# Altium PCB Copy of TQ210_BOARD_V4-20121031.PcbDoc (part 3 of 8)
Units mm, origin at the board's own origin, x right, y up, seen from the top; angles counter-clockwise.
Board outline 191.2 x 131.27 mm, 2 copper layers (TopLayer, BottomLayer); 362 components, 455 nets, 1594 pads, 630 vias.
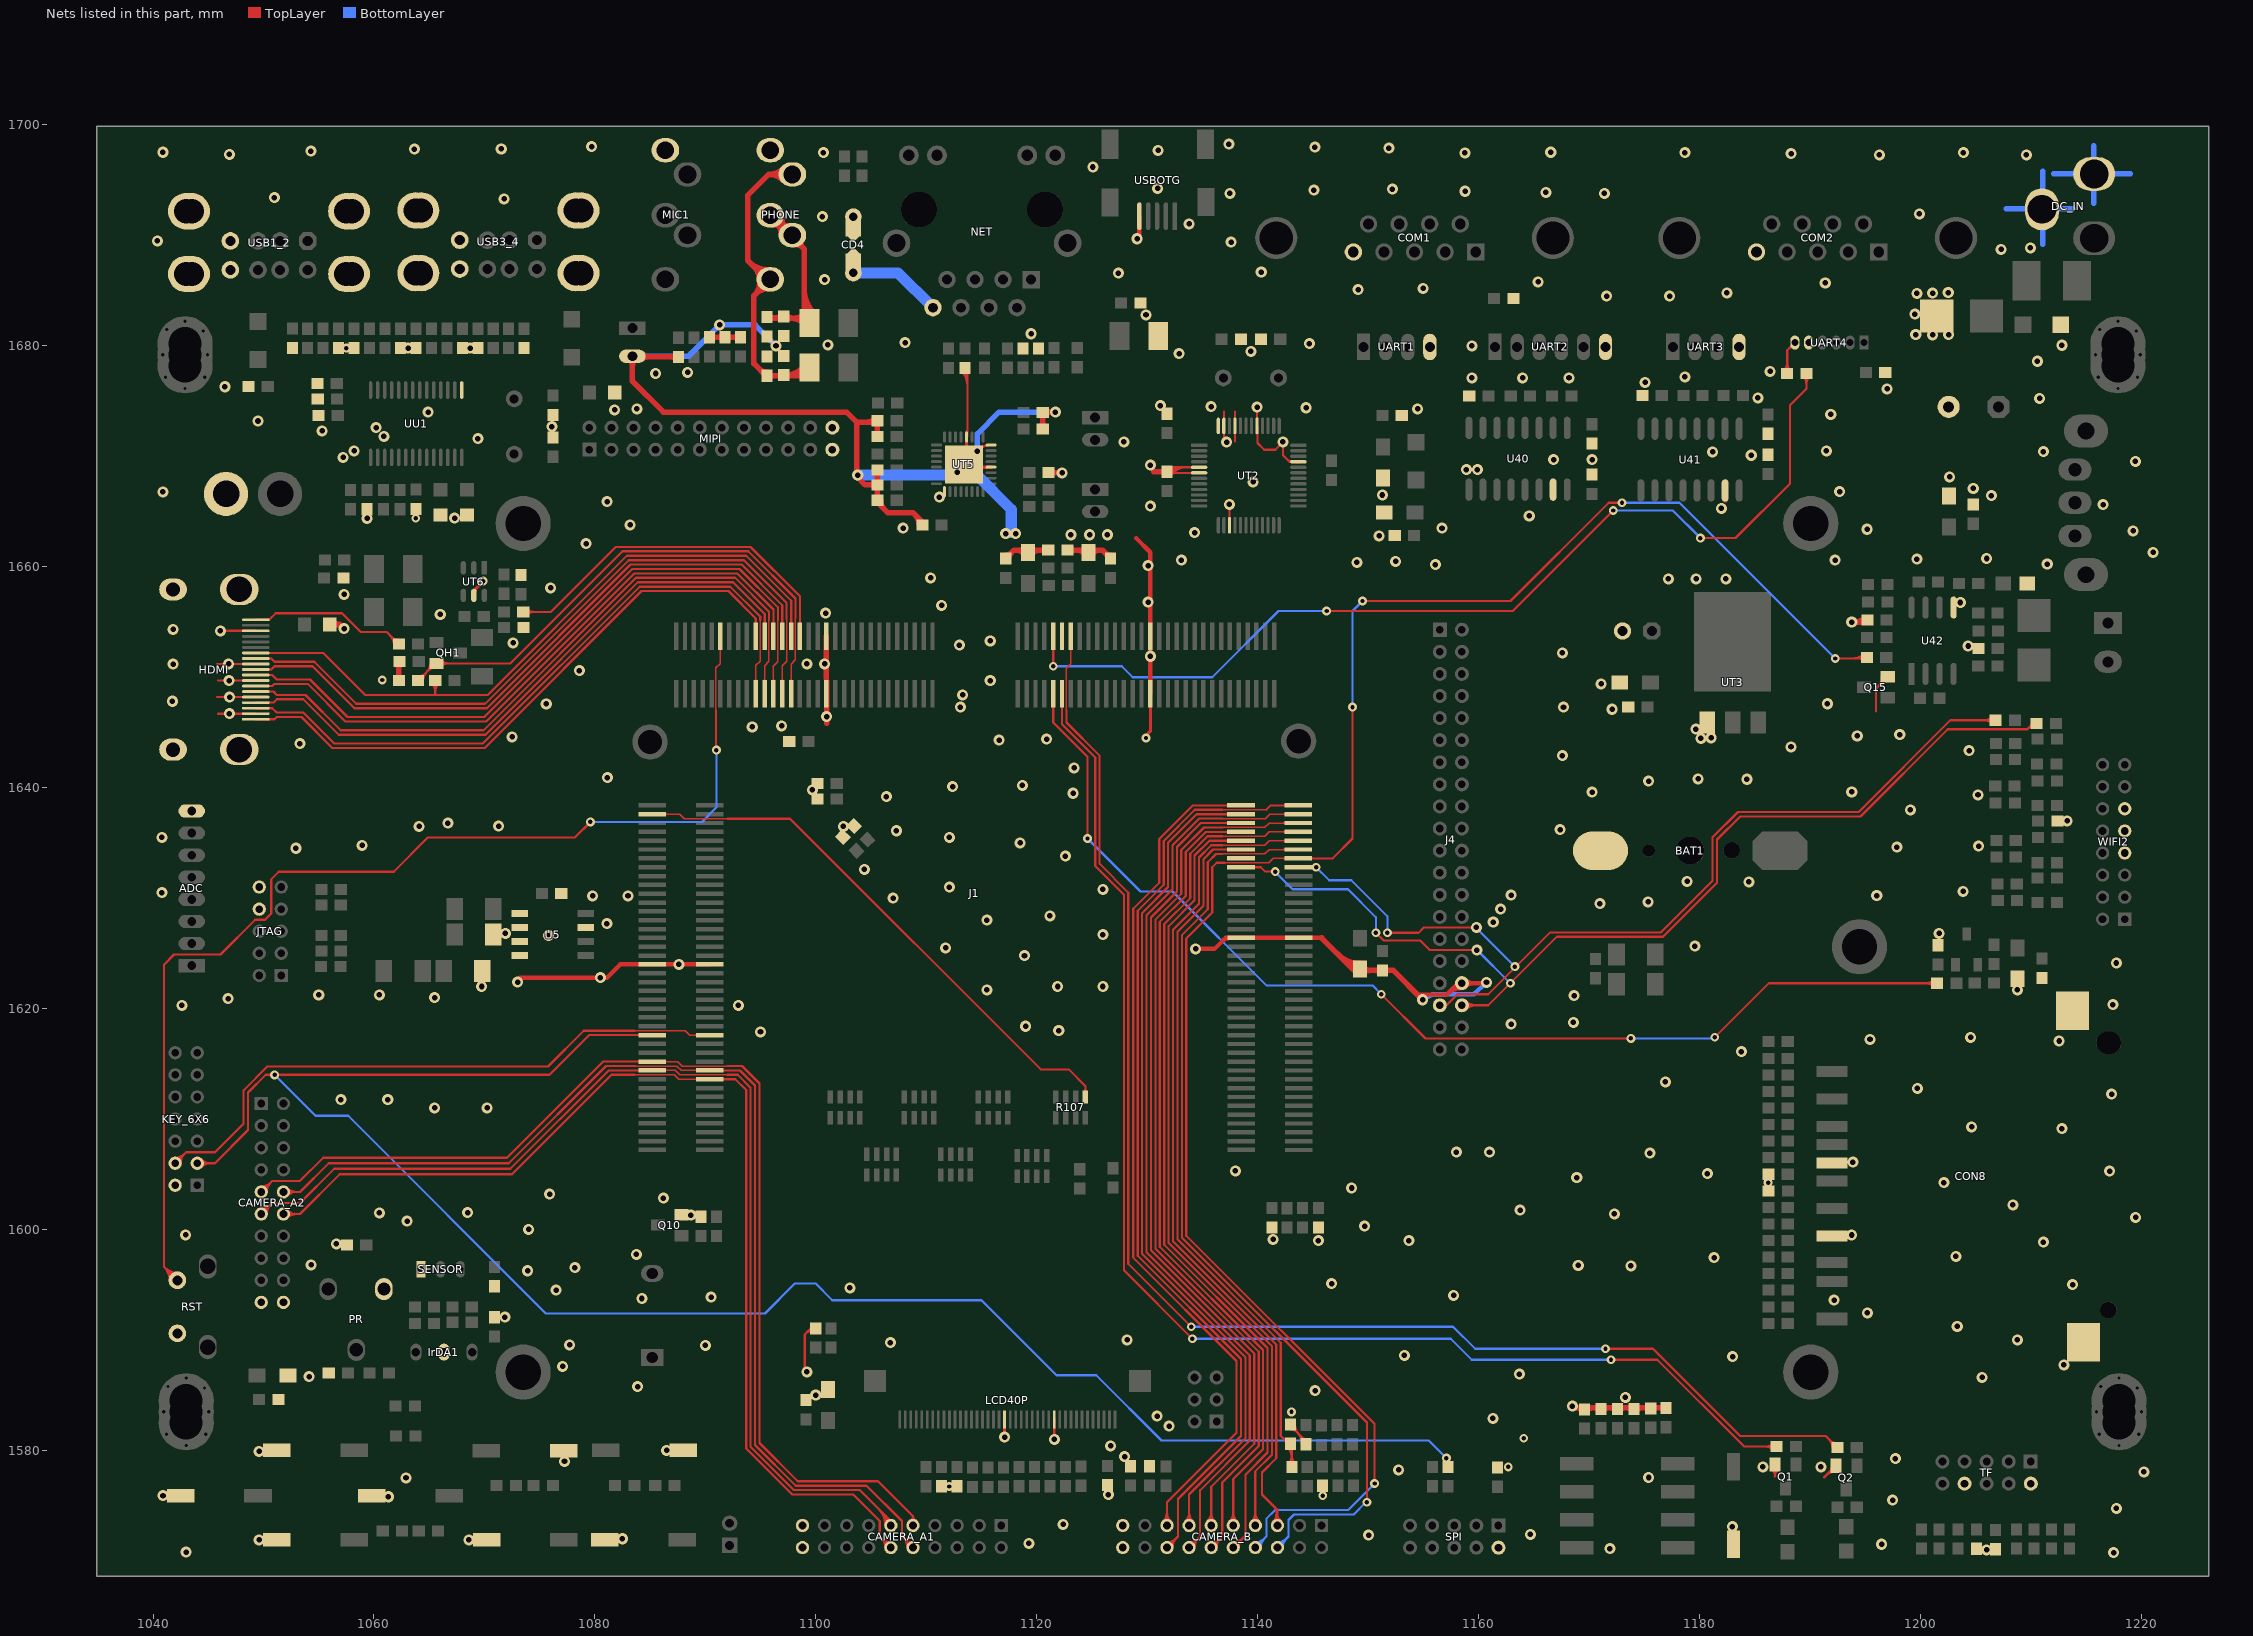
[diagram p3: the nets of this part, all layers, seen from the top]

## Via types
v1: diameter 1, hole 0.5, TopLayer to BottomLayer, 458 vias
v2: diameter 0.8, hole 0.4, TopLayer to BottomLayer, 172 vias

## Nets (pads, with @x,y where several pads share a name; then routed paths per layer and width w, separated by ;. In a path a pad name is that pad's centre, name@x,y a point inside that pad or via, vN(x,y) a via of type N, cw(c..) or ccw(c..) an arc to the next point about the centre after c; other vN are vias at no path point) (continued)
CAMDATA4: CAMERA_A1.12 CAMERA_A2.12 J1.18 | length 103.8
  TopLayer w0.135: 1083.6,1614 1087.2,1614 1087.6,1613.6 J1.18@1090.4,1613.6
  TopLayer w0.2: CAMERA_A2.12@1051.8,1601.4 1053.3,1601.4 1056.9,1605 1072.5,1605 1081.5,1614 1083.6,1614 ; CAMERA_A2.12@1052.012,1601.188 cw(c1052.524,1600.676) 1052.524,1601.4 cw(c1052.524,1602.124) CAMERA_A2.12@1052.012,1601.612 ; CAMERA_A2.12@1052.154,1601.046 cw(c1053.007,1600.193) 1053.007,1601.4 cw(c1053.007,1602.607) CAMERA_A2.12@1052.154,1601.754 ; J1.18@1090.4,1613.6 1092.719,1613.6 1093.7,1612.619 1093.7,1580.163 1097.863,1576 1103.4,1576 1105.8,1573.6 1105.8,1572.2 CAMERA_A1.12@1106.8,1571.2 ; CAMERA_A1.12@1106.3,1571.2 ccw(c1105.093,1571.2) 1105.946,1572.054 ccw(c1106.8,1572.907) CAMERA_A1.12@1106.8,1571.7 ; CAMERA_A1.12@1106.5,1571.2 ccw(c1105.776,1571.2) 1106.288,1571.712 ccw(c1106.8,1572.224) CAMERA_A1.12@1106.8,1571.5
CAMDATA5: CAMERA_A1.11 CAMERA_A2.11 J1.19 | length 105.7
  TopLayer w0.135: J1.19@1085.2,1614.4 1087.3,1614.4 1087.7,1614 1092,1614
  TopLayer w0.2: CAMERA_A2.11@1049.8,1601.4 1050.8,1602.4 1053.3,1602.4 1056.4,1605.5 1072.35,1605.5 1081.25,1614.4 J1.19@1085.2,1614.4 ; CAMERA_A2.11@1049.8,1601.7 ccw(c1049.8,1602.424) 1050.312,1601.912 ccw(c1050.824,1601.4) CAMERA_A2.11@1050.1,1601.4 ; CAMERA_A2.11@1049.8,1601.9 ccw(c1049.8,1603.107) 1050.654,1602.254 ccw(c1051.507,1601.4) CAMERA_A2.11@1050.3,1601.4 ; 1092,1614 1092.929,1614 1094.1,1612.829 1094.1,1580.328 1098.028,1576.4 1104,1576.4 1106.8,1573.6 CAMERA_A1.11@1106.8,1573.2 ; 1105.664,1574.736 cw(c1104.127,1573.2) CAMERA_A1.11@1106.3,1573.2 ; 1106.005,1574.395 cw(c1104.81,1573.2) CAMERA_A1.11@1106.5,1573.2 ; 1106.346,1574.054 cw(c1105.493,1573.2) CAMERA_A1.11@1106.7,1573.2
CAMDATA6: CAMERA_A1.10 CAMERA_A2.10 J1.20 | length 105.7
  TopLayer w0.135: 1083.6,1614.8 1087.4,1614.8 1087.8,1614.4 J1.20@1090.4,1614.4
  TopLayer w0.2: CAMERA_A2.10@1051.8,1603.4 1053.3,1603.4 1055.9,1606 1072.2,1606 1081,1614.8 1083.6,1614.8 ; CAMERA_A2.10@1052.012,1603.188 cw(c1052.524,1602.676) 1052.524,1603.4 cw(c1052.524,1604.124) CAMERA_A2.10@1052.012,1603.612 ; CAMERA_A2.10@1052.154,1603.046 cw(c1053.007,1602.193) 1053.007,1603.4 cw(c1053.007,1604.607) CAMERA_A2.10@1052.154,1603.754 ; J1.20@1090.4,1614.4 1093.138,1614.4 1094.5,1613.038 1094.5,1580.494 1098.194,1576.8 1104.6,1576.8 1107.8,1573.6 1107.8,1572.2 CAMERA_A1.10@1108.8,1571.2 ; CAMERA_A1.10@1108.3,1571.2 ccw(c1107.093,1571.2) 1107.946,1572.054 ccw(c1108.8,1572.907) CAMERA_A1.10@1108.8,1571.7 ; CAMERA_A1.10@1108.5,1571.2 ccw(c1107.776,1571.2) 1108.288,1571.712 ccw(c1108.8,1572.224) CAMERA_A1.10@1108.8,1571.5
CAMDATA7: CAMERA_A1.9 CAMERA_A2.9 J1.21 | length 104.8
  TopLayer w0.135: J1.21@1085.2,1615.2 1087.5,1615.2 1087.9,1614.8 1092,1614.8
  TopLayer w0.2: CAMERA_A2.9@1049.8,1603.4 1050.8,1604.4 1053.3,1604.4 1055.4,1606.5 1072.05,1606.5 1080.75,1615.2 J1.21@1085.2,1615.2 ; CAMERA_A2.9@1049.8,1603.7 ccw(c1049.8,1604.424) 1050.312,1603.912 ccw(c1050.824,1603.4) CAMERA_A2.9@1050.1,1603.4 ; CAMERA_A2.9@1049.8,1603.9 ccw(c1049.8,1605.107) 1050.654,1604.254 ccw(c1051.507,1603.4) CAMERA_A2.9@1050.3,1603.4 ; 1092,1614.8 1093.323,1614.8 1094.9,1613.223 1094.9,1580.66 1098.36,1577.2 1105.634,1577.2 1108.8,1574.034 ; CAMERA_A1.9@1108.564,1573.641 ccw(c1108.354,1574.034) 1108.8,1574.034 ; CAMERA_A1.9@1108.8,1573.2 1108.8,1574.034 ; CAMERA_A1.9@1109.036,1573.641 cw(c1109.246,1574.034) 1108.8,1574.034
DAC_OUT0: J1.109 RT64.1 | length 34.5
  TopLayer w0.2: RT64.1@1073.51,1655.911 1076,1655.911 1081.889,1661.8 1094.1,1661.8 1098.575,1657.325 J1.109@1098.575,1653.687 ; RT64.1@1073.843,1655.629 cw(c1074.526,1654.946) 1074.526,1655.911 cw(c1074.526,1656.877) RT64.1@1073.843,1656.194
EXT_NRESET: J1.91 RST.2 | length 107
  TopLayer w0.135: 1090.965,1647.016 1090.965,1650.837 1091.365,1651.236 J1.91@1091.365,1653.697
  TopLayer w0.2: RST.2@1041.5,1595.4 ccw(c1039.81,1595.4) 1041.005,1596.595 ccw(c1042.2,1597.79) RST.2@1042.2,1596.1 ; RST.2@1041.7,1595.4 ccw(c1040.493,1595.4) 1041.346,1596.254 ccw(c1042.2,1597.107) RST.2@1042.2,1595.9 ; RST.2@1042.2,1595.4 1041,1596.6 1041,1624 1041.9,1624.9 1046.1,1624.9 1049.238,1628.038 1050.138,1628.038 1050.7,1628.6 1050.7,1631.7 1051.385,1632.385 1061.785,1632.385 1064.9,1635.5 1078.2,1635.5 v2(1079.6,1636.9) ; v2@1090.981,1643.419 1090.981,1647
  BottomLayer w0.2: v2(1079.6,1636.9) 1089.703,1636.9 1091,1638.197 v2(1091,1643.4)
GND: ADC.8 BAT1.2 C1.2 C3.2 C5.2 C6.2 C8.2 C9.2 C10.2 C11.2 C12.2 C15.2 C17.2 C21.2 C22.2 C23.2 C101.2 C102.2 C105.2 C106.2 C107.2 C111.2 C201.2 C202.2 C203.2 C205.2 C207.1 C208.1 C210.2 C211.1 C212.1 C403.2 C404.2 C405.2 C413.2 C414.2 C415.2 C423.1 C501.2 C513.2 C517.2 C518.2 CAMERA_A1.19 CAMERA_A1.20 CAMERA_A2.19 CAMERA_A2.20 CAMERA_B.19 CAMERA_B.20 CD1.2 CD2.2 CD4.2 CL1.2 CL2.2 CL3.2 CL4.2 CL5.2 CM1.2 CM2.2 CM3.2 CM4.2 CMB1.2 CMB2.2 COM1.5 COM2.5 CON8.3 CON8.6 CON8.13 CON8.14 CS1.2 CS2.2 CT6.1 CU1.2 CU2.2 CU3.1 CU4.2 CU5.2 CU6.2 CU7.2 CU10.1 CU11.1 CV1.2 CW1.2 CW2.1 CW4.1 CW5.2 D6.1 D8.1 D101.1 DC_IN.2 DC_IN.3 HDMI.2 HDMI.5 HDMI.8 HDMI.11 HDMI.17 HDMI.20 HDMI.21 HDMI.22 HDMI.23 IrDA1.2 J1.43 J1.44 J1.115 J1.116 J1.171 J1.172 J1.231 J1.232 J4.34 JTAG.8 JTAG.10 KEY1.2 KEY2.2 KEY3.2 KEY4.2 KEY5.2 KEY6.2 KEY7.2 KEY8.2 KEY_6X6.2 KEYON.2 L502.1 LCD40P.20 LCD40P.29 MIPI.23 MIPI.24 POWER.2 PR.1 Q1.E Q2.E Q10.E Q15.E R31.2 R204.2 R424.2 RF2.2 RH13.1 RH14.2 RM6.2 RM21.1 RMB6.2 RMB21.1 RO1.1 RO2.2 RO3.2 RO4.2 RO5.1 RO6.1 RST.1 RT1.2 RT3.1 RT63.2 RT65.2 RU3.1 RU4.1 RU7.1 RU8.1 RU11.1 RU12.1 RU15.1 RU16.1 RU17.2 RU21.2 SENSOR.1 SPI.2 TF.2 TF.8 TVOUT.2 U5.1 U5.2 U5.3 U5.4 U5.7 U40.15 U41.15 U42.5 UART1.4 UART2.6 UART3.4 UART4.5 USB1_2.4 USB1_2.8 USB1_2.9 USB1_2.10 USB1_2.11 USB1_2.12 USB3_4.4 USB3_4.8 USB3_4.9 USB3_4.10 USB3_4.11 USB3_4.12 USBOTG.5 UT2.5 UT2.6 UT2.15 UT2.33 UT2.41 UT2.45 UT2.47 UT2.48 UT3.1 UT5.9 UT6.5 UU1.1 WIFI2.7 WIFI2.9 WIFI2.11 | length 238.1
  TopLayer w0.2: 1045.8,1648.2 HDMI.5@1049.3,1648.2 ; 1045.8,1651.2 HDMI.11@1049.3,1651.2 ; v1@1045.8,1654.2 HDMI.17@1049.3,1654.2 ; 1045.9,1646.7 HDMI.2@1049.3,1646.7 ; 1045.9,1649.7 HDMI.8@1049.3,1649.7 ; RH13.1@1062.252,1651.359 RH13.1@1062.298,1651.405 ; UT6.5@1069.045,1657.845 UT6.5@1069.045,1657.412 UT6.5@1069.1,1657.467 ; 1099.015,1590.515 cw(c1099.759,1589.772) R31.2@1099.961,1590.804 ; v1(1099.2,1587.1) 1099,1587.3 1099,1590.5 1099.55,1591.05 R31.2@1100,1591.05 ; 1099.281,1590.781 cw(c1099.846,1590.216) R31.2@1100,1591 ; 1100.975,1645.825 1101,1645.8 ; C211.1@1131.659,1668.791 cw(c1132.172,1668.278) C211.1@1132.172,1669.004 ; C211.1@1131.8,1668.65 cw(c1132.655,1667.795) 1132.655,1669.004 ; C211.1@1131.941,1668.509 cw(c1133.138,1667.312) 1133.138,1669.004 ; C211.1@1131.941,1668.691 ccw(c1132.393,1669.143) 1132.393,1668.504 ; C211.1@1132,1669 1132.004,1669.004 UT2.5@1134.703,1669.004 ; C211.1@1132.004,1668.504 UT2.6@1134.703,1668.504 ; C211.1@1132.083,1668.267 cw(c1132.655,1667.695) 1132.655,1668.504 ; C211.1@1132.083,1668.367 cw(c1133.621,1666.829) 1133.621,1669.004 ; C211.1@1132.083,1668.833 ccw(c1132.876,1669.626) 1132.876,1668.504 ; v1@1136.953,1671.6 1136.953,1674.055 ; UT2.15@1137.453,1663.754 v1(1137.453,1665.653) ; 1137.953,1671.343 1137.953,1674.045 ; UT2.41@1139.918,1672.119 cw(c1139.712,1671.913) 1140.003,1671.913 ; UT2.41@1139.953,1672.754 v1(1139.953,1674.453) v1@1140.1,1674.6 ; UT2.41@1140.003,1672.704 1140.003,1671.2 1140.603,1670.6 1141.6,1670.6 v1(1142.3,1671.3) 1142.3,1670.1 1142.896,1669.504 UT2.33@1143.6,1669.504 ; 1142.664,1669.736 ccw(c1143.103,1670.176) UT2.33@1143.103,1669.554 ; RMB6.2@1143,1581.9 cw(c1143,1581.135) 1143.541,1581.676 ; RMB6.2@1143,1582.35 1143,1582.217 C8.2@1144.448,1580.769 ; RMB6.2@1143.2,1582.3 ccw(c1143.884,1582.3) RMB6.2@1143.4,1581.817 ; RMB6.2@1143.4,1582.3 ccw(c1144.567,1582.3) 1143.742,1581.475 ; 1143.562,1581.655 cw(c1142.518,1580.611) C8.2@1143.995,1580.611 ; 1143.904,1581.313 cw(c1143.201,1580.611) C8.2@1144.195,1580.611 ; 1144.073,1581.144 ccw(c1144.395,1581.465) C8.2@1144.395,1581.011 ; J4.34@1158.1,1622.3 J4.34@1158.5,1622.3 ; v1(1160.729,1622.374) v1@1160.729,1622.629 ; Q1.E@1186.577,1578.272 cw(c1186.008,1577.649) 1186.852,1577.649 ; 1186.832,1577.629 1186.852,1577.649 ; Q1.E@1186.852,1578.7 1186.852,1577.649 ; Q1.E@1187.127,1578.272 ccw(c1187.695,1577.649) 1186.852,1577.649 ; 1191.289,1577.538 Q2.E@1192.36,1578.609 ; 1191.447,1577.696 cw(c1192.36,1576.782) Q2.E@1192.36,1578.074 ; 1191.754,1578.002 ccw(c1191.274,1578.482) Q2.E@1191.952,1578.482 ; 1191.788,1578.037 cw(c1192.36,1577.465) Q2.E@1192.36,1578.274 ; 1196,1646.9 1196,1648.981 Q15.E@1197.059,1650.04 ; 1196.146,1649.126 ccw(c1195.232,1650.04) Q15.E@1196.524,1650.04 ; 1196.452,1649.433 cw(c1196.932,1648.953) Q15.E@1196.932,1649.632 ; 1196.487,1649.468 ccw(c1195.915,1650.04) Q15.E@1196.724,1650.04
  TopLayer w0.25: v1@1117.1,1580.85 LCD40P.20@1117.1,1583.3 ; v1@1121.6,1581.1 LCD40P.29@1121.6,1582.8
  TopLayer w0.3: UT6.5@1069.045,1657.845 v2(1069.9,1658.7) ; UT6.5@1069.145,1657.762 cw(c1069.585,1657.762) 1069.274,1658.074 ; v2@1129.9,1644.7 1130.306,1645.106 J1.172@1130.306,1648.495 ; UT2.33@1143.6,1669.504 UT2.33@1143.703,1669.504
  TopLayer w0.4: v1@1073.2,1622.8 1081.1,1622.8 1082.3,1624 J1.44@1090.4,1624 ; 1129,1662.6 1130.296,1661.304 1130.296,1655.322 J1.172@1130.296,1648.506 ; v1@1129.3,1689.9 USBOTG.5@1129.3,1691.75 ; v1(1134.4,1625.4) 1136.1,1625.4 1137.095,1626.395 J1.231@1143.715,1626.395 1145.805,1626.395 ; 1136.833,1626.133 cw(c1137.465,1625.501) 1137.465,1626.395 ccw(c1137.372,1625.747) 1136.91,1626.21 ; 1154.527,1621.275 1157.127,1621.275 ; v1(1154.95,1620.8) 1155.425,1621.275 ; 1157.106,1621.244 1158.163,1622.3 v1@1160.7,1622.3 ; 1157.181,1621.319 cw(c1158.5,1620) J4.34@1158.5,1621.865 ; 1157.864,1622.002 cw(c1158.5,1621.366) J4.34@1158.5,1622.265 ; J4.34@1158.808,1621.992 cw(c1159.55,1621.25) 1159.55,1622.3 cw(c1159.55,1623.35) J4.34@1158.808,1622.608
  TopLayer w0.5: CU7.2@1056.004,1654.779 1056.921,1654.779 v1(1057.3,1654.4) ; CU7.2@1056.252,1654.531 cw(c1056.849,1653.934) 1056.849,1654.779 cw(c1056.849,1655.624) CU7.2@1056.252,1655.026 ; RH13.1@1062.071,1651.229 cw(c1061.636,1650.793) 1062.252,1650.793 ; RH14.2@1062.075,1649.871 ccw(c1061.648,1650.298) 1062.252,1650.298 ccw(c1062.855,1650.298) RH14.2@1062.429,1649.871 ; RH14.2@1062.252,1649.695 RH13.1@1062.252,1651.359 ; 1062.252,1650.811 cw(c1062.843,1650.811) RH13.1@1062.425,1651.229 ; J1.115@1100.965,1653.697 1100.975,1645.825 ; C513.2@1121.078,1668.524 v1@1122.276,1668.524 ; C513.2@1121.305,1668.347 cw(c1121.731,1667.92) 1121.731,1668.524 cw(c1121.731,1669.128) C513.2@1121.305,1668.701 ; L502.1@1122.8,1661.5 1125.95,1661.5 C518.2@1126.7,1660.75 ; L502.1@1123.027,1661.323 cw(c1123.454,1660.896) 1123.454,1661.5 cw(c1123.454,1662.104) L502.1@1123.027,1661.677 ; 1123.58,1661.5 cw(c1123.58,1660.301) C517.2@1124.428,1661.149 ; 1123.961,1661.5 ccw(c1123.961,1662.16) C517.2@1124.428,1661.693 ; C517.2@1124.972,1661.149 cw(c1125.82,1660.301) 1125.82,1661.5 ; C517.2@1124.972,1661.693 ccw(c1125.439,1662.16) 1125.439,1661.5 ; 1126.188,1661.262 ccw(c1126.7,1661.774) C518.2@1126.7,1661.05 ; C518.2@1126.309,1661.141 cw(c1125.967,1660.8) C518.2@1126.45,1660.8 ; 1130.6,1668.597 1130.603,1668.6 C211.1@1131.8,1668.6 ; 1145.805,1626.395 1148.75,1623.45 1152.3,1623.45 v1(1154.95,1620.8) ; 1147.295,1624.905 ccw(c1149.263,1626.874) C21.2@1149.263,1624.09 ; 1148.148,1624.052 ccw(c1149.263,1625.166) C21.2@1149.263,1623.59 ; C21.2@1149.535,1623.179 cw(c1150.19,1622.524) 1150.19,1623.45 ; C21.2@1149.535,1623.723 ccw(c1150.195,1624.383) 1150.195,1623.45 ; CMB2.2@1151.123,1623.273 ccw(c1150.696,1622.846) 1150.696,1623.45 ccw(c1150.696,1624.054) CMB2.2@1151.123,1623.627 ; CMB2.2@1151.477,1623.273 cw(c1151.904,1622.846) 1151.904,1623.45 cw(c1151.904,1624.054) CMB2.2@1151.477,1623.627 ; v1@1168.324,1583.868 1168.342,1583.85 RT1.2@1177,1583.85 ; v1@1168.816,1583.85 cw(c1168.816,1582.96) RO1.1@1169.445,1583.589 ; RO1.1@1169.799,1583.589 cw(c1170.428,1582.96) 1170.428,1583.85 ; 1170.376,1583.85 cw(c1170.376,1583.076) RO2.2@1170.923,1583.623 ; BAT1.2@1171,1632.9 BAT1.2@1171,1634.5 ; RO2.2@1171.277,1583.623 cw(c1171.824,1583.076) 1171.824,1583.85 ; 1171.876,1583.85 cw(c1171.876,1583.076) RO3.2@1172.423,1583.623 ; RO3.2@1172.777,1583.623 cw(c1173.324,1583.076) 1173.324,1583.85 ; 1173.376,1583.85 cw(c1173.376,1583.076) RO4.2@1173.923,1583.623 ; RO4.2@1174.277,1583.623 cw(c1174.824,1583.076) 1174.824,1583.85 ; C1.2@1175.423,1583.673 ccw(c1174.996,1583.246) 1174.996,1583.85 ccw(c1174.996,1584.454) C1.2@1175.423,1584.027 ; C1.2@1175.777,1583.673 cw(c1176.204,1583.246) 1176.204,1583.85 cw(c1176.204,1584.454) C1.2@1175.777,1584.027 ; RT1.2@1176.823,1583.673 ccw(c1176.396,1583.246) 1176.396,1583.85 ccw(c1176.396,1584.454) RT1.2@1176.823,1584.027 ; U41.15@1182.33,1666.07 U41.15@1182.33,1667.112 ; v1(1193.8,1655) 1195.022,1655 C423.1@1195.21,1655.187 ; v1@1194.104,1655 ccw(c1194.104,1656.243) C423.1@1194.983,1655.364
  BottomLayer w0.2: v1@1160.729,1622.357 v1(1160.729,1622.374)
  BottomLayer w0.4: v1(1154.95,1620.8) 1155.878,1621.282 1159.578,1621.282 v1@1160.729,1622.357
  BottomLayer w0.5: 1207.798,1692.4 1213.8,1692.4 ; 1211.098,1689.2 1211.098,1695.8 ; 1212.1,1695.597 1219,1695.597 ; 1215.7,1692.897 1215.7,1698.098
  other v1: 1217.5,1570.75 1043,1570.787 1206,1571 1171.9,1571.1 1196.5,1571.5 1119.302,1571.574 1049.6,1571.9 1068.6,1571.9 1082.5,1572 1150.061,1572.336 1164.7,1572.4 1183,1573.1 1122.4,1573.3 1217.75,1574.75 1197.5,1575.5 1061.3,1575.8 1040.9,1575.9 1126.5,1576 1062.9,1577.5 1175.398,1577.543 1220.241,1578.051 1152.779,1578.229 1185.75,1578.5 1191,1578.5 1077.25,1579 1197.75,1579.25 1127.97,1579.435 1049.6,1579.9 1086.5,1580 1126.7,1580.4 1121.613,1580.997 1117.1,1581.2 1132,1582.2 1161.298,1582.9 1130.9,1583.1 1168.5,1584 1173.3,1584.8 1100,1585 1145.21,1585.417 1083.869,1585.773 1205.6,1586.6 1054.125,1586.687 1163.7,1586.9 1077.087,1587.597 1213,1587.75 1183.005,1588.491 1153.3,1588.6 1090,1589.5 1077.722,1589.557 1106.75,1589.75 1128.2,1590 1208.8,1589.997 1203.35,1591.234 1071.855,1592.072 1195.222,1592.453 1192.2,1593.6 1084.25,1593.75 1090.524,1593.875 1157.757,1594.028 1076.5,1594.5 1103.098,1594.714 1213.798,1595 1146.7,1595.1 1073.912,1596.263 1078.198,1596.542 1173.8,1596.7 1169.035,1596.746 1054.303,1596.796 1181.329,1597.457 1203.223,1597.558 1083.767,1597.736 1056.6,1598.7 1211.148,1598.854 1145.5,1599 1153.7,1598.997 1141.4,1599.1 1193.795,1599.5 1042.949,1599.514 1074,1600 1149.7,1600.3 1063,1600.75 1219.5,1601.097 1088.7,1601.3 1172.312,1601.419 1060.5,1601.5 1068.476,1601.521 1163.777,1601.749 1208.38,1602.232 1086.206,1602.842 1075.9,1603.2 1148.512,1603.756 1202.131,1604.239 1168.9,1604.7 1180.719,1605.051 1217.143,1605.28 1138,1605.3 1193.9,1606.1 1175.512,1606.906 1158,1607 1161,1607 1212.825,1609.141 1204.646,1609.293 1065.5,1611 1070.25,1611 1057,1611.75 1061.25,1611.75 1217.32,1612.265 1199.744,1612.773 1176.934,1613.357 1183.8,1616.1 1212.571,1617.066 1195.451,1617.218 1204.57,1617.396 1094.998,1617.9 1122,1618 1119,1618.4 1162.964,1618.59 1168.603,1618.742 1042.6,1620.297 1093,1620.297 1217.447,1620.368 1046.8,1620.897 1065.5,1621 1168.654,1621.18 1055,1621.25 1060.5,1621.25 1115.5,1621.7 1208.8,1621.7 1069.75,1622 1121.9,1622 1126,1622 1073,1622.397 1080.5,1622.8 1087.6,1624 1217.752,1624.127 1118.9,1624.8 1111.75,1625.5 1179.601,1625.651 1075.8,1626.6 1126,1626.7 1071.9,1626.8 1201.7,1626.8 1081.098,1627.697 1161.339,1627.835 1115.5,1628 1121.2,1628.397 1162,1628.997 1170.991,1629.512 1175.36,1629.664 1107,1630 1079.8,1630.2 1083,1630.2 1196.061,1630.223 1162.964,1630.274 1040.8,1630.497 1203.884,1630.604 1126,1630.8 1112.1,1631 1184.478,1631.467 1178.89,1631.518 1104.4,1632.6 1122.6,1633.8 1052.932,1634.515 1197.889,1634.617 1205.281,1634.719 1058.926,1634.769 1118.5,1634.997 1040.8,1635.5 1112.098,1635.5 1107.298,1636.1 1167.4,1636.197 1064.098,1636.5 1102.5,1636.5 1071.296,1636.522 1066.7,1636.797 1213.3,1637 1199.1,1638 1106.4,1639.197 1205.23,1639.341 1123.298,1639.497 1170.298,1639.6 1193.8,1639.621 1099.7,1639.8 1112.4,1640.097 1118.698,1640.2 1175.398,1640.6 1184.3,1640.764 1179.898,1640.8 1081.126,1640.916 1123.4,1641.8 1167.598,1642.9 1204.417,1643.355 1188.298,1643.7 1053.3,1643.997 1116.6,1644.3 1120.9,1644.4 1180.135,1644.472 1181.075,1644.523 1072.5,1644.597 1194.298,1644.7 1198.143,1644.802 1179.678,1645.31 1094.25,1645.5 1096.9,1645.6 1100.975,1646.428 1046.912,1646.7 1172.098,1647.1 1113.1,1647.297 1167.7,1647.297 1075.6,1647.597 1191.598,1647.6 1041.756,1647.825 1046.937,1648.2 1113.3,1648.4 1171.1,1649.397 1046.886,1649.7 1115.8,1649.697 1078.6,1650.597 1041.806,1651.178 1046.836,1651.2 1099.2,1651.2 1100.8,1651.2 1130.296,1651.9 1167.598,1652.2 1204.341,1652.829 1112.998,1652.9 1072.591,1653.108 1115.8,1653.3 1046.099,1654.2 1041.806,1654.327 1066,1655.697 1100.9,1655.8 1111.4,1656.5 1203.63,1656.766 1130.098,1656.8 1057.3,1657.497 1076,1658.097 1177.2,1658.9 1179.7,1658.9 1182.395,1658.899 1110.4,1658.997 1130.098,1660.1 1156.1,1660.197 1211.5,1660.25 1148.998,1660.4 1152.5,1660.497 1133.098,1660.6 1192.3,1660.6 1199.7,1660.7 1206,1660.75 1221.08,1661.312 1079.2,1662.1 1151,1662.8 1123.1,1662.9 1124.8,1662.9 1126.4,1662.9 1134.298,1663.1 1219.276,1663.243 1195.198,1663.4 1107.9,1663.5 1156.7,1663.497 1083.2,1663.797 1059.384,1664.376 1067.298,1664.397 1164.598,1664.6 1182,1665.297 1130.3,1665.5 1216.558,1665.63 1081.1,1665.897 1111.2,1666.3 1206.449,1666.443 1151.3,1666.5 1040.892,1666.773 1192.7,1666.797 1204.798,1667.104 1139.6,1667.697 1202.665,1668.145 1122.3,1668.5 1158.898,1668.8 1159.9,1668.8 1130.3,1669.197 1219.479,1669.542 1166.8,1669.7 1170.3,1669.7 1057.2,1669.9 1184.7,1670.1 1181.2,1670.4 1211.148,1670.431 1058.2,1670.5 1191.5,1670.5 1127.9,1671.3 1137.2,1671.297 1069.4,1671.597 1060.9,1671.8 1055.3,1672.3 1060.198,1672.6 1076.1,1672.7 1049.5,1673.2 1191.898,1673.8 1064.9,1673.997 1081.798,1674.2 1083.8,1674.297 1154.5,1674.3 1144.4,1674.4 1135.798,1674.5 1131.2,1674.6 1210.818,1675.257 1185.298,1675.3 1197,1676.1 1046.5,1676.3 1175.1,1676.7 1159.4,1677.1 1163.998,1677.1 1168.198,1677.1 1178.698,1677.2 1085.5,1677.5 1088.4,1677.6 1186.4,1677.7 1210.615,1678.61 1132.9,1679.3 1139.4,1679.5 1063.1,1679.8 1068.7,1679.8 1159.4,1679.997 1212.825,1680.058 1101.1,1680.1 1144.7,1680.2 1108.1,1680.297 1201.115,1680.997 1199.591,1681.023 1202.563,1681.023 1119.5,1681.1 1129.9,1682.8 1199.515,1682.877 1171.6,1684.497 1177.3,1684.497 1199.693,1684.757 1201.115,1684.782 1182.5,1684.797 1202.538,1684.833 1149.1,1685.097 1154.998,1685.2 1191.4,1685.697 1165.4,1685.8 1100.8,1685.997 1127.4,1686.597 1140.333,1686.687 1207.313,1688.744 1209.98,1688.871 1137.6,1689.4 1040.4,1689.5 1129.1,1689.7 1133.805,1691.056 1100.6,1691.697 1199.921,1691.945 1071.778,1693.316 1050.99,1693.42 1137.5,1693.8 1171.4,1693.8 1166.1,1693.9 1158.799,1694.002 1145.1,1694.1 1152.2,1694.2 1130.96,1694.256 1125.1,1696.197 1196.3,1697.3 1209.6,1697.3 1046.901,1697.331 1188.3,1697.4 1158.773,1697.482 1100.698,1697.5 1178.7,1697.5 1203.9,1697.5 1040.892,1697.533 1166.546,1697.533 1054.292,1697.636 1131,1697.7 1063.65,1697.812 1071.524,1697.838 1151.9,1697.9 1145.2,1698 1079.703,1698.041 1137.412,1698.269
  other v2: 1145.9,1575.9 1112.088,1576.73 1162.7,1578.5 1164.1,1581.1 1143.076,1583.487 1186.231,1604.239 1129.9,1644.5 1060.75,1649.75 1063.778,1664.402 1057.5,1679.8
GND_AC97: C503.2 C504.2 C505.2 C506.1 C509.2 C510.2 C511.2 C512.2 C519.2 C520.2 C521.2 C522.2 C523.2 C525.2 C526.2 C527.2 L502.2 MIC1.1 MIC2.2 PHONE.1 R502.1 R503.1 R506.2 UT5.20 UT5.24 UT5.28 UT5.33 | length 143.3
  TopLayer w0.2: C506.1@1113.217,1677.667 cw(c1111.984,1676.434) 1113.728,1676.434 ; C506.1@1113.359,1677.809 cw(c1112.467,1676.917) 1113.728,1676.917 ; C506.1@1113.5,1677.95 cw(c1112.95,1677.4) 1113.728,1677.4 ; UT5.28@1113.635,1672.142 ccw(c1113.411,1672.365) 1113.728,1672.365 ; UT5.28@1113.653,1671.749 1113.728,1671.824 1113.728,1677.672 C506.1@1113.7,1677.7 ; UT5.33@1114.967,1669.02 UT5.33@1114.971,1669.024
  TopLayer w0.25: UT5.33@1113.285,1669.321 cw(c1115.517,1668.583) UT5.33@1114.996,1670.875 ; UT5.33@1113.523,1669.243 cw(c1116.008,1668.42) UT5.24@1115.428,1670.973 ; UT5.33@1114.992,1670.874 UT5.24@1115.551,1671.001
  TopLayer w0.3: UT5.33@1113.646,1670.747 UT5.28@1113.653,1671.749 ; UT5.33@1114.971,1669.024 UT5.20@1115.878,1669.024
  TopLayer w0.5: MIC2.2@1083.153,1678.813 cw(c1082.555,1678.215) 1083.4,1678.215 cw(c1084.245,1678.215) MIC2.2@1083.647,1678.813 ; MIC2.2@1083.4,1679.06 1083.4,1676.8 1086.2,1674 1102.8,1674 1103.7,1673.1 ; MIC2.2@1083.5,1679 1087.56,1679 C525.2@1087.574,1678.986 ; MIC2.2@1084.247,1678.813 cw(c1084.7,1678.36) 1084.7,1679 ; MIC2.2@1084.247,1679.307 ccw(c1084.99,1680.05) 1084.99,1679 ; 1086.936,1679 cw(c1086.936,1678.347) C525.2@1087.397,1678.809 ; 1087.005,1679 ccw(c1087.005,1679.554) C525.2@1087.397,1679.162 ; 1091.117,1680.783 C511.2@1093.181,1680.783 ; C509.2@1091.604,1680.607 ccw(c1091.177,1680.18) 1091.177,1680.783 ccw(c1091.177,1681.387) C509.2@1091.604,1680.96 ; C509.2@1091.958,1680.607 cw(c1092.385,1680.18) 1092.385,1680.783 cw(c1092.385,1681.387) C509.2@1091.958,1680.96 ; C511.2@1093.004,1680.607 ccw(c1092.577,1680.18) 1092.577,1680.783 ccw(c1092.577,1681.387) C511.2@1093.004,1680.96 ; 1104.625,1673.1 ccw(c1104.625,1674.127) C526.2@1105.351,1673.401 ; C504.2@1105.286,1668.486 C504.2@1105.579,1668.778 ; C503.2@1105.351,1667.247 ccw(c1104.924,1666.82) 1104.924,1667.424 ccw(c1104.924,1668.028) C503.2@1105.351,1667.601 ; C527.2@1105.401,1666.201 ccw(c1104.974,1666.628) 1105.578,1666.628 ccw(c1106.181,1666.628) C527.2@1105.755,1666.201 ; C503.2@1105.401,1667.247 cw(c1104.974,1666.82) 1105.578,1666.82 cw(c1106.181,1666.82) C503.2@1105.755,1667.247 ; C503.2@1105.401,1667.601 ccw(c1104.974,1668.028) 1105.578,1668.028 ccw(c1106.181,1668.028) C503.2@1105.755,1667.601 ; C504.2@1105.402,1668.602 cw(c1104.977,1668.177) 1105.578,1668.177 ; C505.2@1105.402,1671.955 ccw(c1104.977,1672.38) 1105.578,1672.38 ; C526.2@1105.401,1673.047 cw(c1104.974,1672.62) 1105.578,1672.62 cw(c1106.181,1672.62) C526.2@1105.755,1673.047 ; C503.2@1105.578,1667.424 1104.476,1667.424 1103.7,1668.2 1103.7,1673.1 ; 1105.578,1668.173 cw(c1106.184,1668.173) C504.2@1105.755,1668.602 ; C504.2@1105.579,1668.778 1105.578,1665.822 1106.5,1664.9 1108.8,1664.9 1109.65,1664.05 C520.2@1109.65,1663.8 ; C505.2@1105.578,1671.779 C526.2@1105.578,1673.224 ; 1105.578,1672.384 ccw(c1106.184,1672.384) C505.2@1105.755,1671.955 ; C526.2@1105.578,1673.1 1103.7,1673.1 ; C527.2@1105.878,1666.024 ccw(c1107.089,1666.024) 1106.233,1665.167 ; 1108.961,1664.739 cw(c1108.022,1663.8) C520.2@1109.35,1663.8 ; C521.2@1117.2,1660.75 1117.95,1661.5 L502.2@1121.05,1661.5 ; C521.2@1117.2,1661.05 ccw(c1117.2,1661.774) 1117.712,1661.262 ; C521.2@1117.45,1660.8 cw(c1117.933,1660.8) C521.2@1117.591,1661.141 ; 1118.08,1661.5 cw(c1118.08,1660.301) C519.2@1118.928,1661.149 ; 1118.461,1661.5 ccw(c1118.461,1662.16) C519.2@1118.928,1661.693 ; C519.2@1119.472,1661.149 cw(c1120.32,1660.301) 1120.32,1661.5 ; C519.2@1119.472,1661.693 ccw(c1119.939,1662.16) 1119.939,1661.5 ; C512.2@1120.381,1672.65 ccw(c1119.954,1673.077) 1120.558,1673.077 ccw(c1121.161,1673.077) C512.2@1120.735,1672.65 ; C510.2@1120.381,1673.796 cw(c1119.954,1673.37) 1120.558,1673.37 cw(c1121.161,1673.37) C510.2@1120.735,1673.796 ; C512.2@1120.558,1672.473 C510.2@1120.558,1673.973 1120.585,1674 v1(1121.7,1674) ; C510.2@1120.785,1673.796 cw(c1121.276,1673.305) v1@1121.276,1674 ; C510.2@1120.785,1674.15 ccw(c1121.147,1674.512) 1121.147,1674 ; L502.2@1120.823,1661.323 ccw(c1120.396,1660.896) 1120.396,1661.5 ccw(c1120.396,1662.104) L502.2@1120.823,1661.677 ; 1090.985,1680.783 cw(c1090.985,1681.387) 1090.558,1680.96 ccw(c1090.985,1681.387) 1090.985,1680.783 ; 1090.985,1680.783 ccw(c1090.985,1680.18) 1090.558,1680.607 cw(c1090.985,1680.18) 1090.985,1680.783
  BottomLayer w0.5: MIC2.2@1083.4,1679.06 1088.46,1679.06 v1(1091.3,1681.9) 1094.5,1681.9 v1(1096.4,1680) ; MIC2.2@1084.247,1678.813 cw(c1084.845,1678.215) 1084.845,1679.06 cw(c1084.845,1679.905) MIC2.2@1084.247,1679.307 ; v1(1114.637,1670.467) 1114.637,1672.037 1116.6,1674 v1(1121.7,1674)
  BottomLayer w1: v1(1103.8,1668.3) 1114.6,1668.3 ; v1@1114.6,1670.4 1114.6,1668.3 ; v1@1117.7,1663.1 1117.7,1665.2 1114.6,1668.3
  other v1: 1117.2,1663 1118.1,1663 1112.808,1668.562
GND_CHASIS: CD4.1 NET.8 | length 8.5
  BottomLayer w1: CD4.1@1103.408,1686.605 1107.465,1686.605 NET.8@1110.61,1683.46
GPC1_0: J1.149 RN4.1 | length 91.8
  TopLayer w0.2: J1.149@1121.425,1652.585 cw(c1121.229,1652.389) 1121.506,1652.389 ; J1.149@1121.496,1653.811 J1.149@1121.496,1653.706 J1.149@1121.512,1653.722 ; v2(1121.5,1651) 1121.506,1651.006 J1.149@1121.506,1653.695 ; 1121.506,1652.439 cw(c1121.712,1652.439) J1.149@1121.566,1652.585 ; v2(1146.25,1656) 1163.1,1656 v2(1172.2,1665.1) ; v2(1180.1,1662.6) 1183.269,1662.6 1188.2,1667.531 1188.2,1674.631 1189.7,1676.131 RN4.1@1189.7,1677.5 ; RN4.1@1189.417,1677.217 cw(c1188.734,1676.534) 1189.7,1676.534 cw(c1190.666,1676.534) RN4.1@1189.983,1677.217
  BottomLayer w0.2: v2(1121.5,1651) 1127.7,1651 1128.7,1650 1135.9,1650 1141.9,1656 v2(1146.25,1656) ; v2(1172.2,1665.1) 1177.6,1665.1 v2(1180.1,1662.6)
GPC1_1: J1.150 RW19.1 | length 102.7
  TopLayer w0.2: J1.150@1121.425,1647.385 cw(c1121.229,1647.189) 1121.506,1647.189 ; 1121.506,1647.239 cw(c1121.712,1647.239) J1.150@1121.566,1647.385 ; J1.150@1121.506,1648.495 1121.506,1645.894 1124.6,1642.8 v2(1124.6,1635.4) ; v2(1151.2,1621.3) 1155.2,1617.3 v2(1173.8,1617.3) ; v2(1181.4,1617.4) 1186.295,1622.295 RW19.1@1201.521,1622.295 ; RW19.1@1201.189,1622.012 ccw(c1200.506,1621.329) 1200.506,1622.295 ccw(c1200.506,1623.261) RW19.1@1201.189,1622.578
  BottomLayer w0.2: v2(1124.6,1635.4) 1129.4,1630.6 1132.3,1630.6 1140.8,1622.1 1150.4,1622.1 v2(1151.2,1621.3) ; v2(1173.8,1617.3) v2@1181.4,1617.3
GPC1_2: J1.151
GPC1_3: J1.152 R17.1 | length 121.7
  TopLayer w0.2: 1122.296,1645.728 J1.152@1122.296,1648.506 ; 1122.306,1645.728 1125.3,1642.734 1125.3,1632.9 1127.9,1630.3 1127.9,1596.3 v2(1134.1,1590.1) ; v2(1172,1588.2) 1176.2,1588.2 1184.059,1580.341 R17.1@1186.991,1580.341 ; R17.1@1186.659,1580.059 ccw(c1185.976,1579.376) 1185.976,1580.341 ccw(c1185.976,1581.307) R17.1@1186.659,1580.624
  BottomLayer w0.2: v2(1134.1,1590.1) 1157.5,1590.1 1159.4,1588.2 v2(1172,1588.2)
GPC1_4: J1.153 R18.1 | length 132.4
  TopLayer w0.135: 1122.695,1647.023 1122.695,1650.806 1123.096,1651.206 J1.153@1123.096,1653.706
  TopLayer w0.2: 1122.705,1647.012 1122.705,1645.895 1125.7,1642.9 1125.7,1633.1 1128.3,1630.5 1128.3,1596.9 v2(1134,1591.2) ; v2(1171.5,1589.2) 1175.8,1589.2 1183.7,1581.3 1191.45,1581.3 R18.1@1192.5,1580.25 ; 1191.732,1581.018 cw(c1190.964,1580.25) R18.1@1192.05,1580.25 ; 1191.853,1580.897 ccw(c1192.45,1581.495) R18.1@1192.45,1580.65 ; R18.1@1192.073,1580.677 cw(c1191.646,1580.25) R18.1@1192.25,1580.25
  BottomLayer w0.2: v2(1134,1591.2) 1157.7,1591.2 1159.7,1589.2 v2(1171.5,1589.2)
GPJ0_0: CAMERA_B.16 J1.201 | length 88.5
  TopLayer w0.135: 1136.8,1638 1140.8,1638
  TopLayer w0.2: CAMERA_B.16@1131.8,1571.2 1132.8,1572.2 1132.8,1575.6 1138.5,1581.3 1138.5,1588.266 1129.15,1597.616 1129.15,1628.85 1131.5,1631.2 1131.5,1635.179 1134.316,1637.995 ; CAMERA_B.16@1131.8,1571.5 ccw(c1131.8,1572.224) 1132.312,1571.712 ccw(c1132.824,1571.2) CAMERA_B.16@1132.1,1571.2 ; CAMERA_B.16@1131.8,1571.7 ccw(c1131.8,1572.907) 1132.654,1572.054 ccw(c1133.507,1571.2) CAMERA_B.16@1132.3,1571.2 ; 1134.316,1638 1136.8,1638 ; 1140.8,1638 1141.2,1638.4 J1.201@1143.7,1638.4 ; J1.201@1142.579,1638.329 ccw(c1142.409,1638.159) 1142.409,1638.4 ccw(c1142.409,1638.641) J1.201@1142.579,1638.471
GPJ0_1: CAMERA_B.15 J1.202 | length 81.3
  TopLayer w0.2: CAMERA_B.15@1131.446,1573.554 ccw(c1130.593,1574.407) 1131.8,1574.407 ccw(c1133.007,1574.407) CAMERA_B.15@1132.154,1573.554 ; CAMERA_B.15@1131.588,1573.412 ccw(c1131.076,1573.924) 1131.8,1573.924 ccw(c1132.524,1573.924) CAMERA_B.15@1132.012,1573.412 ; CAMERA_B.15@1131.8,1573.2 1131.8,1575.3 1138.1,1581.6 1138.1,1588.1 1128.75,1597.45 1128.75,1629.05 1131.1,1631.4 1131.1,1635.35 1134.145,1638.395 J1.202@1138.515,1638.395
GPJ0_2: CAMERA_B.14 J1.203 | length 86.8
  TopLayer w0.135: 1136.801,1637.201 1140.686,1637.201 1141.085,1637.6 J1.203@1143.7,1637.6 ; 1142.33,1637.6 ccw(c1142.33,1637.92) J1.203@1142.556,1637.694 ; 1142.33,1637.6 cw(c1142.33,1637.28) J1.203@1142.556,1637.506
  TopLayer w0.2: CAMERA_B.14@1133.8,1571.2 1134.8,1572.2 1134.8,1576.4 1139.3,1580.9 1139.3,1588.597 1129.95,1597.947 1129.95,1628.45 1132.3,1630.8 1132.3,1634.8 1134.695,1637.195 ; CAMERA_B.14@1133.8,1571.5 ccw(c1133.8,1572.224) 1134.312,1571.712 ccw(c1134.824,1571.2) CAMERA_B.14@1134.1,1571.2 ; CAMERA_B.14@1133.8,1571.7 ccw(c1133.8,1572.907) 1134.654,1572.054 ccw(c1135.507,1571.2) CAMERA_B.14@1134.3,1571.2 ; 1134.7,1637.195 1134.7,1637.2 1136.8,1637.2
GPJ0_3: CAMERA_B.13 J1.204 | length 79.5
  TopLayer w0.2: CAMERA_B.13@1133.446,1573.554 ccw(c1132.593,1574.407) 1133.8,1574.407 ccw(c1135.007,1574.407) CAMERA_B.13@1134.154,1573.554 ; CAMERA_B.13@1133.588,1573.412 ccw(c1133.076,1573.924) 1133.8,1573.924 ccw(c1134.524,1573.924) CAMERA_B.13@1134.012,1573.412 ; CAMERA_B.13@1133.8,1573.2 1133.8,1576 1138.9,1581.1 1138.9,1588.431 1129.55,1597.781 1129.55,1628.65 1131.9,1631 1131.9,1635.013 1134.481,1637.595 J1.204@1138.515,1637.595
GPJ0_4: CAMERA_B.12 J1.205 | length 84.9
  TopLayer w0.135: 1136.801,1636.399 1140.638,1636.399 1141.038,1636.8 J1.205@1143.7,1636.8 ; J1.205@1142.556,1636.706 ccw(c1142.33,1636.48) 1142.33,1636.8 ccw(c1142.33,1637.12) J1.205@1142.556,1636.894
  TopLayer w0.2: CAMERA_B.12@1135.8,1571.2 1136.8,1572.2 1136.8,1577.1 1140.1,1580.4 1140.1,1588.928 1130.75,1598.278 1130.75,1628.05 1133.1,1630.4 1133.1,1634.35 1135.145,1636.395 1136.795,1636.395 1136.8,1636.4 ; CAMERA_B.12@1135.8,1571.5 ccw(c1135.8,1572.224) 1136.312,1571.712 ccw(c1136.824,1571.2) CAMERA_B.12@1136.1,1571.2 ; CAMERA_B.12@1135.8,1571.7 ccw(c1135.8,1572.907) 1136.654,1572.054 ccw(c1137.507,1571.2) CAMERA_B.12@1136.3,1571.2
GPJ0_5: CAMERA_B.11 J1.206 | length 77.6
  TopLayer w0.2: CAMERA_B.11@1135.446,1573.554 ccw(c1134.593,1574.407) 1135.8,1574.407 ccw(c1137.007,1574.407) CAMERA_B.11@1136.154,1573.554 ; CAMERA_B.11@1135.588,1573.412 ccw(c1135.076,1573.924) 1135.8,1573.924 ccw(c1136.524,1573.924) CAMERA_B.11@1136.012,1573.412 ; CAMERA_B.11@1135.8,1573.2 1135.8,1576.7 1139.7,1580.6 1139.7,1588.763 1130.35,1598.113 1130.35,1628.25 1132.7,1630.6 1132.7,1634.629 1134.866,1636.795 J1.206@1138.515,1636.795
GPJ0_6: CAMERA_B.10 J1.207 | length 83.1
  TopLayer w0.135: 1136.801,1635.601 1140.648,1635.601 1141.047,1636 J1.207@1143.7,1636 ; J1.207@1142.556,1635.906 ccw(c1142.33,1635.68) 1142.33,1636 ccw(c1142.33,1636.32) J1.207@1142.556,1636.094
  TopLayer w0.2: 1136.8,1635.6 1136.795,1635.595 1135.476,1635.595 1133.9,1634.019 1133.9,1630 1131.55,1627.65 1131.55,1598.61 1140.9,1589.26 1140.9,1579.8 1138.9,1577.8 1138.9,1572.3 CAMERA_B.10@1137.8,1571.2 ; CAMERA_B.10@1137.8,1571.5 ccw(c1137.8,1572.224) 1138.312,1571.712 ccw(c1138.824,1571.2) CAMERA_B.10@1138.1,1571.2 ; CAMERA_B.10@1137.8,1571.7 ccw(c1137.8,1572.907) 1138.654,1572.054 ccw(c1139.507,1571.2) CAMERA_B.10@1138.3,1571.2
GPJ0_7: CAMERA_B.9 J1.208 | length 75.7
  TopLayer w0.2: CAMERA_B.9@1137.446,1573.554 ccw(c1136.593,1574.407) 1137.8,1574.407 ccw(c1139.007,1574.407) CAMERA_B.9@1138.154,1573.554 ; CAMERA_B.9@1137.588,1573.412 ccw(c1137.076,1573.924) 1137.8,1573.924 ccw(c1138.524,1573.924) CAMERA_B.9@1138.012,1573.412 ; CAMERA_B.9@1137.8,1573.2 1137.8,1577.4 1140.5,1580.1 1140.5,1589.094 1131.15,1598.444 1131.15,1627.85 1133.5,1630.2 1133.5,1634.184 1135.31,1635.995 J1.208@1138.515,1635.995
GPJ1_0: CAMERA_B.5 J1.209 | length 79.3
  TopLayer w0.135: 1136.801,1634.799 1140.662,1634.799 1141.064,1635.2 J1.209@1143.7,1635.2 ; J1.209@1142.556,1635.106 ccw(c1142.33,1634.88) 1142.33,1635.2 ccw(c1142.33,1635.52) J1.209@1142.556,1635.294
  TopLayer w0.2: 1136.8,1634.8 1136.795,1634.795 1135.807,1634.795 1134.7,1633.687 1134.7,1629.5 1132.35,1627.15 1132.35,1598.941 1141.7,1589.591 1141.7,1579.3 1140.4,1578 1140.4,1576 1141.8,1574.6 CAMERA_B.5@1141.8,1573.2 ; CAMERA_B.5@1141.446,1573.554 ccw(c1140.834,1574.166) 1141.7,1574.166 ccw(c1142.766,1574.166) CAMERA_B.5@1142.012,1573.412 ; 1141.7,1574.649 ccw(c1143.249,1574.649) CAMERA_B.5@1142.154,1573.554
GPJ1_1: CAMERA_B.7 J1.210 | length 73.9
  TopLayer w0.2: J1.210@1138.515,1635.195 1135.642,1635.195 1134.3,1633.853 1134.3,1629.8 1131.95,1627.45 1131.95,1598.775 1141.3,1589.425 1141.3,1579.6 1139.8,1578.1 CAMERA_B.7@1139.8,1573.2 ; CAMERA_B.7@1139.446,1573.554 ccw(c1138.593,1574.407) 1139.8,1574.407 ccw(c1141.007,1574.407) CAMERA_B.7@1140.154,1573.554 ; CAMERA_B.7@1139.588,1573.412 ccw(c1139.076,1573.924) 1139.8,1573.924 ccw(c1140.524,1573.924) CAMERA_B.7@1140.012,1573.412
GPJ1_2: CAMERA_B.6 J1.211 | length 88.8
  TopLayer w0.135: 1136.8,1634 1140.645,1634 1141.045,1634.4 J1.211@1143.7,1634.4 ; J1.211@1142.556,1634.306 ccw(c1142.33,1634.08) 1142.33,1634.4 ccw(c1142.33,1634.72) J1.211@1142.556,1634.494
  TopLayer w0.2: 1136.795,1633.995 1136.245,1633.995 1135.5,1633.25 1135.5,1629 1133.15,1626.65 1133.15,1599.273 1149.9,1582.523 v2(1149.9,1575.3) v2@1150,1575.2
  BottomLayer w0.2: CAMERA_B.6@1141.8,1571.2 1142.8,1572.2 1142.8,1573.7 1143.3,1574.2 1148.7,1574.2 v2@1149.8,1575.3 ; CAMERA_B.6@1141.8,1571.5 ccw(c1141.8,1572.224) 1142.312,1571.712 ccw(c1142.824,1571.2) CAMERA_B.6@1142.1,1571.2 ; CAMERA_B.6@1141.8,1571.7 ccw(c1141.8,1572.907) 1142.654,1572.054 ccw(c1143.507,1571.2) CAMERA_B.6@1142.3,1571.2
GPJ1_3: J1.212 RMB5.1 RMB6.1 | length 69.2
  TopLayer w0.2: J1.212@1138.515,1634.395 1135.973,1634.395 1135.1,1633.522 1135.1,1629.3 1132.75,1626.95 1132.75,1599.107 1142.1,1589.757 1142.1,1581.3 1143.1,1580.3 RMB5.1@1143.1,1578.5 ; 1142.225,1581.175 ccw(c1142.664,1581.614) RMB6.1@1142.868,1581.028 ; 1142.45,1580.95 ccw(c1142.781,1581.28) RMB6.1@1142.934,1580.839 ; 1142.494,1580.906 cw(c1142.238,1580.65) RMB6.1@1142.6,1580.65 ; RMB6.1@1142.717,1580.267 cw(c1141.793,1579.343) 1143.1,1579.343 ; RMB5.1@1142.817,1578.833 ccw(c1142.134,1579.516) 1143.1,1579.516 ccw(c1144.066,1579.516) RMB5.1@1143.383,1578.833 ; RMB6.1@1142.859,1580.409 cw(c1142.276,1579.826) 1143.1,1579.826 cw(c1143.724,1579.826) RMB6.1@1143.283,1580.267
GPJ1_4: CAMERA_B.8 J1.213 R427.2 | length 175
  TopLayer w0.135: 1137.001,1633.201 1141.011,1633.201 1141.409,1633.6 J1.213@1143.7,1633.6 ; J1.213@1142.556,1633.506 ccw(c1142.33,1633.28) 1142.33,1633.6 ccw(c1142.33,1633.92) J1.213@1142.556,1633.694
  TopLayer w0.2: 1137,1633.195 1137,1633.2 1136.3,1633.2 1135.9,1632.8 1135.9,1628.7 1133.55,1626.35 1133.55,1623.35 1133.55,1599.438 1150.6,1582.388 v2(1150.6,1577) ; J1.213@1143.7,1633.6 1146.8,1633.6 1148.6,1635.4 v2(1148.6,1647.3) ; J1.213@1144.821,1633.529 cw(c1144.991,1633.359) 1144.991,1633.6 cw(c1144.991,1633.841) J1.213@1144.821,1633.671 ; v2(1149.5,1656.9) 1162.9,1656.9 1171.8,1665.8 v2(1173,1665.8) ; v2(1192.3,1651.7) 1195.067,1651.7 R427.2@1195.17,1651.802 ; 1193.907,1651.7 ccw(c1193.907,1653.015) R427.2@1194.837,1652.085 ; 1194.39,1651.7 ccw(c1194.39,1652.532) R427.2@1194.978,1651.944 ; 1194.401,1651.7 cw(c1194.401,1651.084) R427.2@1194.837,1651.52
  BottomLayer w0.2: CAMERA_B.8@1139.8,1571.2 1140.8,1572.2 1140.8,1573.8 1141.6,1574.6 1148.2,1574.6 v2(1150.6,1577) ; CAMERA_B.8@1139.8,1571.5 ccw(c1139.8,1572.224) 1140.312,1571.712 ccw(c1140.824,1571.2) CAMERA_B.8@1140.1,1571.2 ; CAMERA_B.8@1139.8,1571.7 ccw(c1139.8,1572.907) 1140.654,1572.054 ccw(c1141.507,1571.2) CAMERA_B.8@1140.3,1571.2 ; v2(1148.6,1647.3) 1148.6,1656 v2(1149.5,1656.9) ; v2(1173,1665.8) 1178.2,1665.8 v2(1192.3,1651.7)
GPJ1_5: J1.214
GPJ2_0: J1.215 J4.35 RW17.2 | length 89.8
  TopLayer w0.2: J1.215@1143.715,1632.795 v2@1145.295,1632.795 ; J1.215@1144.821,1632.729 cw(c1144.978,1632.572) v2@1144.978,1632.795 ; J1.215@1144.821,1632.871 ccw(c1145.005,1633.055) v2@1145.005,1632.795 ; v2(1151.755,1626.87) 1154.582,1626.87 1155.065,1627.353 v1(1159.815,1627.353) ; J4.35@1156.5,1620.3 1157.1,1620.3 1158.1,1621.3 1160.9,1621.3 1166.5,1626.9 1176.534,1626.9 1181.2,1631.566 1181.2,1635.5 1183.5,1637.8 1194.425,1637.8 1202.73,1646.105 RW17.2@1206.829,1646.105 ; RW17.2@1206.496,1645.822 ccw(c1205.813,1645.139) 1205.813,1646.105 ccw(c1205.813,1647.071) RW17.2@1206.496,1646.388
  BottomLayer w0.2: v2(1145.3,1632.8) 1146.48,1631.62 1148.486,1631.62 1151.755,1628.351 v2(1151.755,1626.87) ; v1@1159.815,1627.285 v2(1163.3,1623.8)
GPJ2_1: J1.216 J4.36 RW18.2 | length 98.5
  TopLayer w0.2: J1.216@1138.4,1632.8 1140.295,1632.8 1140.695,1632.4 v2(1141.6,1632.4) ; v2(1150.714,1626.87) 1151.425,1626.159 1154.735,1626.159 1155.598,1625.295 v1@1159.789,1625.295 ; J4.36@1158.5,1620.3 1160.9,1620.3 1167.1,1626.5 1176.7,1626.5 1181.6,1631.4 1181.6,1635.3 1183.7,1637.4 1194.59,1637.4 1202.49,1645.3 1209.7,1645.3 RW18.2@1210.3,1645.9 ; J4.36@1158.737,1620.063 cw(c1159.309,1619.491) 1159.309,1620.3 cw(c1159.309,1621.109) J4.36@1158.737,1620.537 ; J4.36@1158.878,1619.922 cw(c1159.792,1619.008) 1159.792,1620.3 cw(c1159.792,1621.592) J4.36@1158.878,1620.678 ; 1209.826,1645.426 cw(c1210.302,1644.949) RW18.2@1210.438,1645.609 ; RW18.2@1209.989,1645.589 ccw(c1209.773,1645.805) RW18.2@1210.079,1645.805
  BottomLayer w0.2: v2@1141.578,1632.4 1143.171,1630.807 1148.182,1630.807 1150.714,1628.275 v2(1150.714,1626.87) ; v1(1159.866,1625.295) v2@1162.867,1622.293
  other v2: 1162.893,1622.293
GPS_IO: RN4.2 UART4.6 | length 5.2
  TopLayer w0.2: RN4.2@1187.667,1677.783 ccw(c1186.984,1678.466) 1187.95,1678.466 ccw(c1188.916,1678.466) RN4.2@1188.233,1677.783 ; RN4.2@1187.95,1677.5 1187.95,1679.6 UART4.6@1188.65,1680.3 ; 1188.135,1679.785 cw(c1188.578,1679.341) UART4.6@1188.64,1679.966
HDMI_CEC: HDMI.13 J1.107 RH16.2 | length 63
  TopLayer w0.2: HDMI.13@1049.3,1652.2 1055.4,1652.2 1059.2,1648.4 1070.3,1648.4 1082.9,1661 1093.7,1661 1097.775,1656.925 J1.107@1097.775,1653.687 ; RH16.2@1065.267,1649.417 cw(c1064.584,1648.734) 1065.55,1648.734 cw(c1066.516,1648.734) RH16.2@1065.833,1649.417 ; 1065.55,1648.45 RH16.2@1065.55,1649.7
HDMI_HPD: J1.108 QH1.E RH14.1 | length 55.6
  TopLayer w0.135: J1.108@1097.671,1649.641 ccw(c1097.445,1649.867) 1097.765,1649.867 ccw(c1098.084,1649.867) J1.108@1097.858,1649.641 ; J1.108@1097.765,1648.497 1097.765,1651.18 1098.164,1651.58 1098.164,1655.364
  TopLayer w0.2: RH14.1@1064.002,1649.695 QH1.E@1065.555,1651.248 ; RH14.1@1064.052,1650.095 ccw(c1064.052,1650.94) 1064.649,1650.342 ; RH14.1@1064.252,1649.695 cw(c1064.855,1649.695) RH14.1@1064.429,1650.121 ; RH14.1@1064.452,1649.695 cw(c1065.538,1649.695) 1064.77,1650.463 ; 1064.789,1650.482 ccw(c1064.023,1651.248) QH1.E@1065.106,1651.248 ; 1064.887,1650.58 cw(c1065.514,1649.953) QH1.E@1065.514,1650.84 ; QH1.E@1065.13,1650.823 ccw(c1064.706,1651.248) QH1.E@1065.306,1651.248 ; QH1.E@1065.641,1651.248 1072.351,1651.248 1082.503,1661.4 1093.9,1661.4 1098.169,1657.131 1098.169,1655.369 ; QH1.E@1066.057,1650.959 cw(c1066.753,1650.263) 1066.753,1651.248 cw(c1066.753,1652.233) QH1.E@1066.057,1651.536
HDMI_TX0N: HDMI.9 J1.104 | length 64.3
  TopLayer w0.135: J1.104@1096.071,1649.641 ccw(c1095.845,1649.867) 1096.165,1649.867 ccw(c1096.484,1649.867) J1.104@1096.258,1649.641 ; J1.104@1096.165,1648.497 1096.165,1651.01 1096.564,1651.409 1096.564,1655.195
  TopLayer w0.2: HDMI.9@1049.3,1650.2 1050.8,1650.2 1051.2,1649.8 1054.2,1649.8 1057.6,1646.4 1069.997,1646.4 1083.397,1659.8 1093.1,1659.8 1096.569,1656.331 1096.569,1655.2
HDMI_TX0P: HDMI.7 J1.103 | length 57.7
  TopLayer w0.2: HDMI.7@1049.3,1649.2 1050.8,1649.2 1051,1649.4 1054,1649.4 1057.4,1646 1070.163,1646 1083.563,1659.4 1092.9,1659.4 1096.165,1656.135 J1.103@1096.165,1653.697
HDMI_TX1N: HDMI.6 J1.102 | length 63
  TopLayer w0.135: J1.102@1095.271,1649.641 ccw(c1095.045,1649.867) 1095.365,1649.867 ccw(c1095.684,1649.867) J1.102@1095.458,1649.641 ; J1.102@1095.365,1648.497 1095.365,1651.061 1095.765,1651.461 1095.765,1655.191
  TopLayer w0.2: HDMI.6@1049.3,1648.7 1050.9,1648.7 1051.2,1648.4 1053.8,1648.4 1057,1645.2 1069.928,1645.2 1083.728,1659 1092.7,1659 1095.756,1655.944 1095.756,1655.2
HDMI_TX1P: HDMI.4 J1.101 | length 56.5
  TopLayer w0.2: HDMI.4@1049.3,1647.7 1050.9,1647.7 1051.2,1648 1053.6,1648 1056.8,1644.8 1070.094,1644.8 1083.894,1658.6 1092.5,1658.6 1095.375,1655.725 J1.101@1095.375,1653.687
HDMI_TX2N: HDMI.3 J1.100 | length 61.7
  TopLayer w0.135: J1.100@1094.471,1649.641 ccw(c1094.245,1649.867) 1094.565,1649.867 ccw(c1094.884,1649.867) J1.100@1094.658,1649.641 ; J1.100@1094.565,1648.497 1094.565,1651.07 1094.963,1651.468 1094.963,1655.195
  TopLayer w0.2: HDMI.3@1049.3,1647.2 1050.8,1647.2 1051.2,1646.8 1053.6,1646.8 1056.4,1644 1069.86,1644 1084.06,1658.2 1092.264,1658.2 1094.969,1655.496 1094.969,1655.2
HDMI_TX2P: HDMI.1 J1.99 | length 55.1
  TopLayer w0.2: HDMI.1@1049.3,1646.2 1051,1646.2 1051.2,1646.4 1053.434,1646.4 1056.234,1643.6 1070.025,1643.6 1084.225,1657.8 1092.1,1657.8 1094.575,1655.325 J1.99@1094.575,1653.687 ; J1.99@1094.565,1653.697 J1.99@1094.588,1653.72
HDMI_TXCN: HDMI.12 J1.106 | length 65.6
  TopLayer w0.12: J1.106@1096.965,1648.497 J1.106@1096.965,1648.605
  TopLayer w0.135: J1.106@1096.871,1649.641 ccw(c1096.645,1649.867) 1096.965,1649.867 ccw(c1097.284,1649.867) J1.106@1097.058,1649.641 ; J1.106@1096.965,1648.605 1096.965,1651.042 1097.366,1651.444 1097.366,1655.29
  TopLayer w0.2: HDMI.12@1049.3,1651.7 1050.7,1651.7 1051,1651.4 1054.6,1651.4 1058.4,1647.6 1070.066,1647.6 1083.066,1660.6 1084.034,1660.6 1093.5,1660.6 1097.356,1656.744 1097.356,1655.3
HDMI_TXCP: HDMI.10 J1.105 | length 59.1
  TopLayer w0.2: HDMI.10@1049.3,1650.7 1050.7,1650.7 1051,1651 1054.434,1651 1058.234,1647.2 1070.231,1647.2 1083.231,1660.2 1093.3,1660.2 1096.975,1656.525 J1.105@1096.975,1653.687
HOTPLUG: HDMI.19 RH12.2 | length 16.5
  TopLayer w0.2: HDMI.19@1049.3,1655.2 1050.5,1655.2 1051.1,1655.8 1057.1,1655.8 1058.8,1654.1 1061.146,1654.1 RH12.2@1062.252,1652.995 ; HDMI.19@1050.425,1655.225 ccw(c1050.425,1655.466) 1050.596,1655.296 ; 1061.484,1653.763 cw(c1060.715,1652.995) RH12.2@1061.802,1652.995 ; 1061.604,1653.642 ccw(c1062.202,1654.24) RH12.2@1062.202,1653.395 ; RH12.2@1061.825,1653.421 cw(c1061.398,1652.995) RH12.2@1062.002,1652.995
HPL: C515.2 C523.1 PHONE.2 PHONE.10 R503.2 | length 43.9
  TopLayer w0.5: 1093.976,1687.603 ccw(c1095.735,1689.362) PHONE.10@1095.735,1686.875 ; 1094.412,1687.168 cw(c1093.269,1686.025) PHONE.10@1094.885,1686.025 ; 1094.475,1684.614 ccw(c1093.42,1685.67) PHONE.10@1094.895,1685.896 ; 1094.54,1684.68 cw(c1095.735,1683.485) PHONE.10@1095.735,1685.175 ; 1094.83,1686.75 ccw(c1095.735,1687.655) PHONE.10@1095.735,1686.375 ; 1094.917,1677.883 ccw(c1095.6,1678.566) C523.1@1095.6,1677.6 ; C523.1@1095.4,1677.3 1099.193,1677.3 C515.2@1099.231,1677.262 ; PHONE.10@1095.504,1686.076 1093.826,1687.754 1093.826,1693.62 1095.731,1695.525 ; C523.1@1095.6,1677.2 1094.4,1678.4 1094.4,1684.539 PHONE.10@1095.885,1686.025 ; C523.1@1095.777,1677.123 cw(c1096.204,1676.696) 1096.204,1677.3 cw(c1096.204,1677.904) C523.1@1095.777,1677.477 ; R503.2@1096.923,1677.123 ccw(c1096.496,1676.696) 1096.496,1677.3 ccw(c1096.496,1677.904) R503.2@1096.923,1677.477 ; R503.2@1096.995,1677.3 ccw(c1096.995,1680.118) C515.2@1098.987,1678.125 ; PHONE.2@1097.124,1694.934 ccw(c1095.731,1693.586) 1095.731,1695.525 ; PHONE.2@1097.124,1696.116 cw(c1095.731,1697.463) 1095.731,1695.525 ; R503.2@1097.277,1677.123 cw(c1097.704,1676.696) 1097.704,1677.3 ; R503.2@1097.277,1677.477 ccw(c1097.704,1677.904) 1097.704,1677.3 ; PHONE.2@1097.763,1695.525 1095.731,1695.525 ; 1098.202,1677.3 ccw(c1098.202,1678.91) C515.2@1099.341,1677.772
HPR: C516.2 C522.1 PHONE.3 PHONE.11 R502.2 | length 32.2
  TopLayer w0.5: C522.1@1095.722,1682.521 1099.207,1682.521 C516.2@1099.256,1682.571 ; C522.1@1095.777,1682.373 cw(c1096.134,1682.016) 1096.134,1682.521 ; C522.1@1095.777,1682.727 ccw(c1096.273,1683.223) 1096.273,1682.521 ; PHONE.11@1095.885,1691.825 1098.956,1688.753 C516.2@1098.956,1682.09 ; PHONE.11@1096.035,1690.975 cw(c1096.035,1689.285) PHONE.3@1097.23,1690.48 ; PHONE.11@1096.199,1691.511 ccw(c1097.735,1693.047) PHONE.3@1097.735,1690.875 ; 1096.307,1682.521 ccw(c1096.307,1683.393) R502.2@1096.923,1682.777 ; PHONE.11@1096.32,1691.39 cw(c1094.954,1690.025) PHONE.3@1096.885,1690.025 ; PHONE.11@1096.385,1691.825 ccw(c1097.592,1691.825) 1096.739,1690.971 ; PHONE.11@1096.885,1691.825 ccw(c1099.299,1691.825) PHONE.3@1097.592,1690.118 ; R502.2@1097.277,1682.777 ccw(c1097.893,1683.393) 1097.893,1682.521 ; 1097.689,1682.521 cw(c1097.689,1680.685) C516.2@1098.987,1681.984 ; 1098.104,1682.521 ccw(c1098.104,1683.77) C516.2@1098.987,1682.887 ; PHONE.3@1098.104,1689.177 cw(c1098.174,1688.321) 1098.781,1688.928 cw(c1099.115,1689.262) PHONE.3@1098.73,1689.534 ; 1098.956,1683.936 ccw(c1100.939,1683.936) C516.2@1099.537,1682.534 ; 1098.956,1685.143 ccw(c1102.146,1685.143) C516.2@1099.891,1682.887
HSYNC: J1.77 R107.1 | length 54.4
  TopLayer w0.12: J1.77@1085.198,1637.595 1087.605,1637.595 ; J1.77@1086.349,1637.501 cw(c1086.576,1637.274) 1086.576,1637.595 ; J1.77@1086.349,1637.699 ccw(c1086.6,1637.95) 1086.6,1637.595
  TopLayer w0.135: J1.77@1085.2,1637.6 1087.705,1637.6 1088.103,1637.201 1091.999,1637.201 ; J1.77@1086.344,1637.506 cw(c1086.57,1637.28) 1086.57,1637.6 cw(c1086.57,1637.92) J1.77@1086.344,1637.694
  TopLayer w0.2: 1092.005,1637.195 1097.662,1637.195 1120.36,1614.497 1122.903,1614.497 1124.411,1612.989 R107.1@1124.411,1612 ; R107.1@1124.305,1612.456 ccw(c1124.049,1612.712) 1124.411,1612.712 ccw(c1124.773,1612.712) R107.1@1124.517,1612.456
KP_COL0: J1.27 KEY_6X6.3 RS17.1 | length 173.7
  TopLayer w0.2: KEY_6X6.3@1044,1606 1045.6,1606 1048.6,1609 1048.6,1612.4 1050.2,1614 1075.9,1614 1079.5,1617.6 J1.27@1085.2,1617.6 ; KEY_6X6.3@1044.212,1605.788 cw(c1044.724,1605.276) 1044.724,1606 cw(c1044.724,1606.724) KEY_6X6.3@1044.212,1606.212 ; KEY_6X6.3@1044.354,1605.646 cw(c1045.207,1604.793) 1045.207,1606 cw(c1045.207,1607.207) KEY_6X6.3@1044.354,1606.354
  BottomLayer w0.2: v2(1051,1614) 1054.7,1610.3 1057.663,1610.3 1075.563,1592.4 1095.4,1592.4 1098.1,1595.1 1100,1595.1 1101.5,1593.6 1115,1593.6 1121.8,1586.8 1125.4,1586.8 1131.3,1580.9 1155.5,1580.9 v2(1157.1,1579.3)
KP_COL1: J1.28 KEY_6X6.4 | length 58.8
  TopLayer w0.135: 1083.6,1618 1088.2,1618 1088.6,1617.6 J1.28@1090.4,1617.6 ; J1.28@1089.256,1617.506 ccw(c1089.03,1617.28) 1089.03,1617.6 ccw(c1089.03,1617.92) J1.28@1089.256,1617.694
  TopLayer w0.2: KEY_6X6.4@1042,1606 1043,1607 1045.6,1607 1048.2,1609.6 1048.2,1612.6 1050.35,1614.75 1075.75,1614.75 1079,1618 1083.6,1618 ; KEY_6X6.4@1042,1606.3 ccw(c1042,1607.024) 1042.512,1606.512 ccw(c1043.024,1606) KEY_6X6.4@1042.3,1606 ; KEY_6X6.4@1042,1606.5 ccw(c1042,1607.707) 1042.854,1606.854 ccw(c1043.707,1606) KEY_6X6.4@1042.5,1606